# Altium PCB Roboszpon.PcbDoc
Units mm, origin at the board's own origin, x right, y up, seen from the top; angles counter-clockwise.
Board outline 70 x 35 mm, 2 copper layers (Top Layer, Bottom Layer); 60 components, 53 nets, 274 pads, 196 vias.
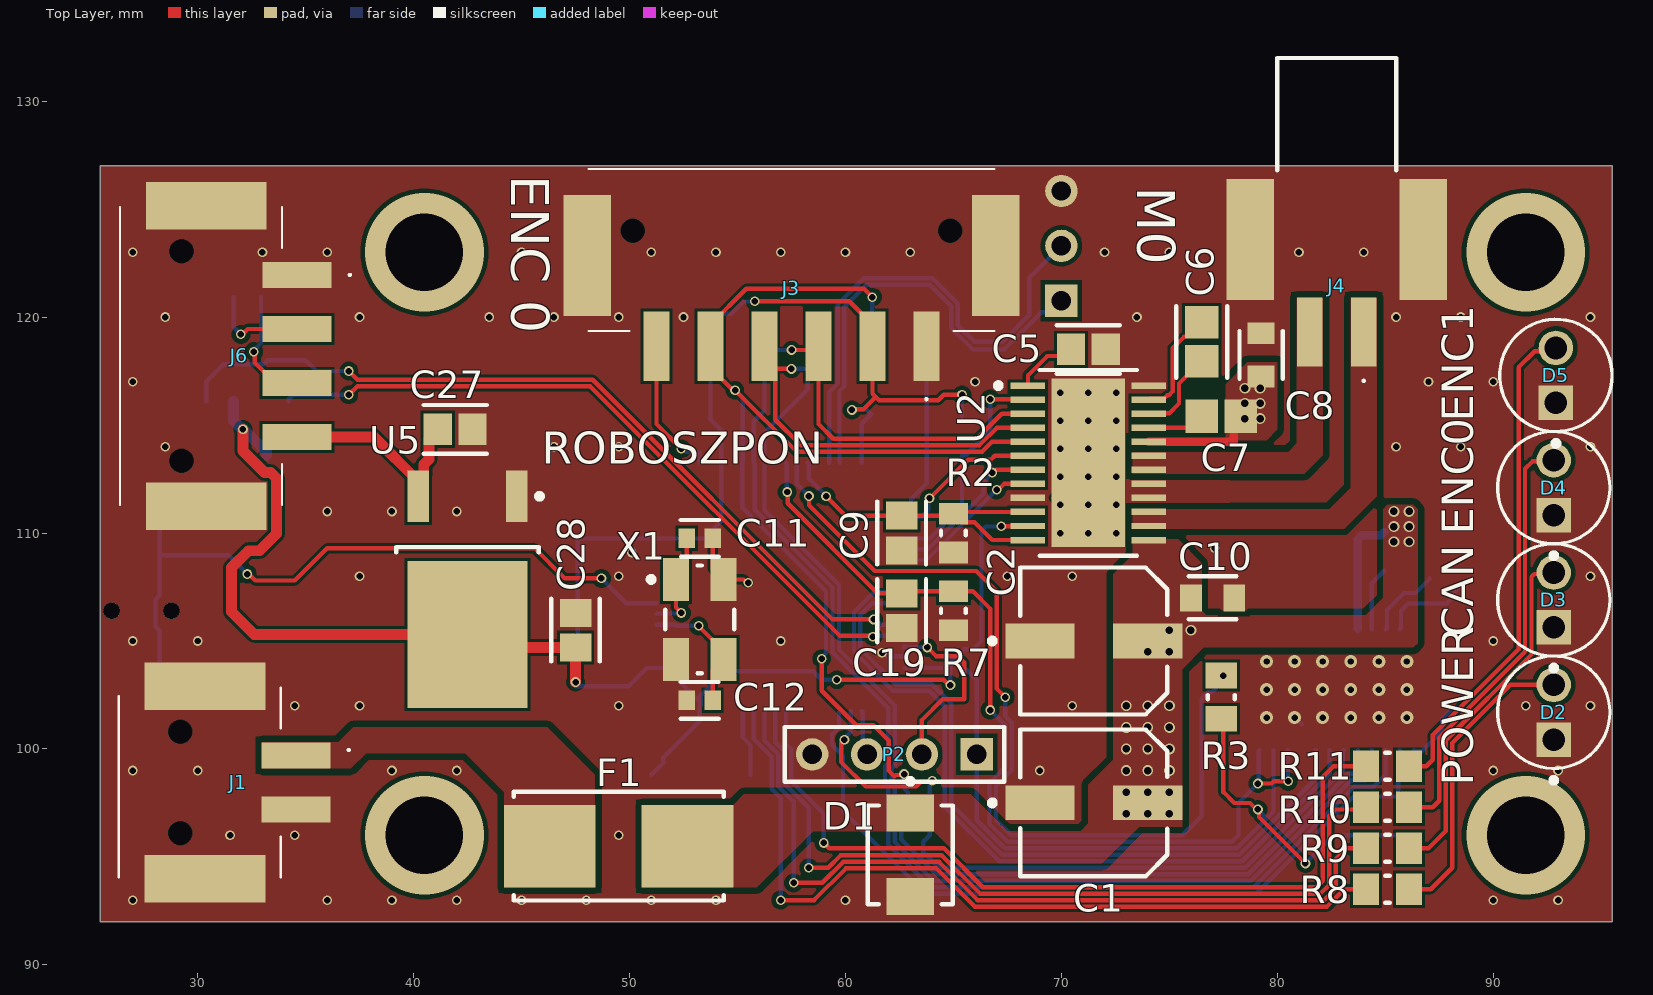
[diagram p0: Top Layer view]
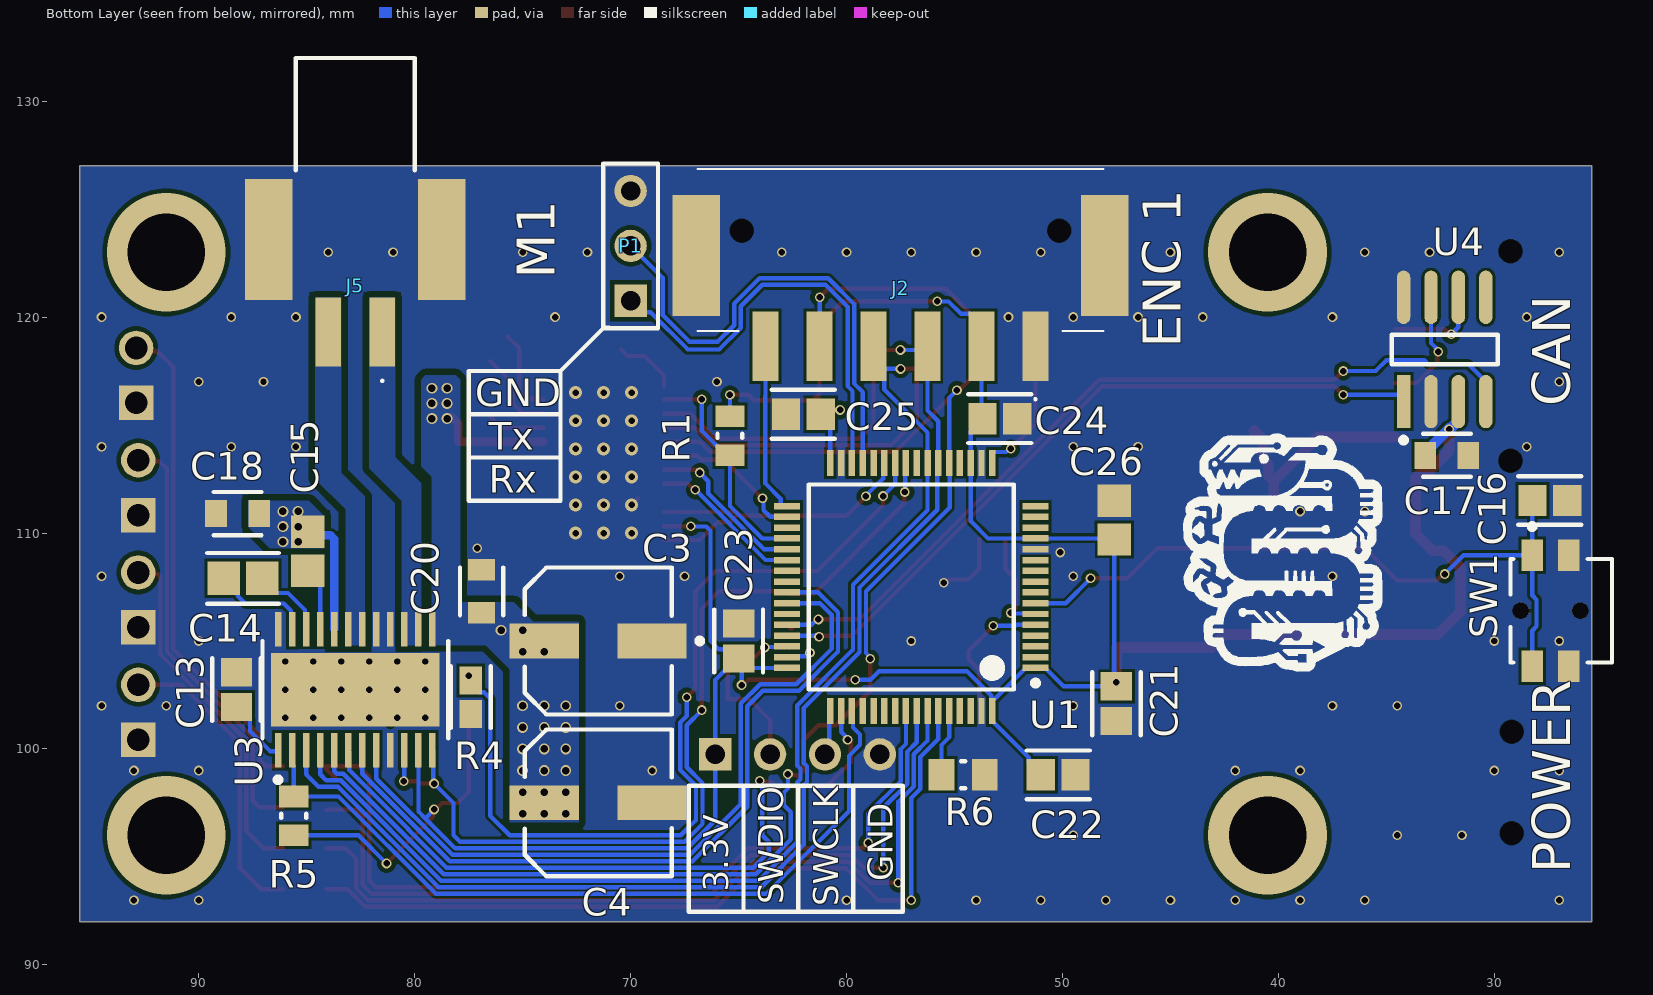
[diagram p1: Bottom Layer view, seen from below]
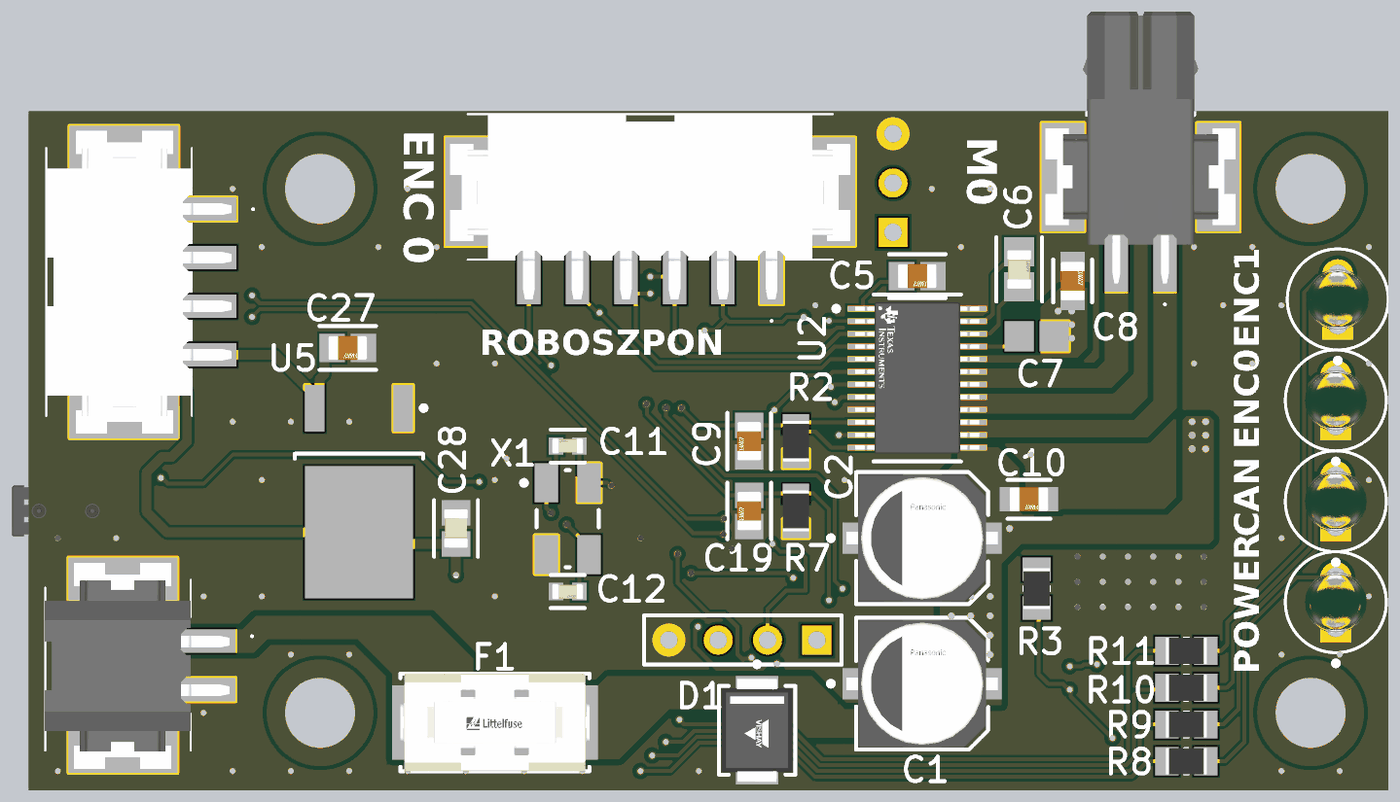
[diagram p2: 3D render of the assembled board from above, using the file's embedded part models]
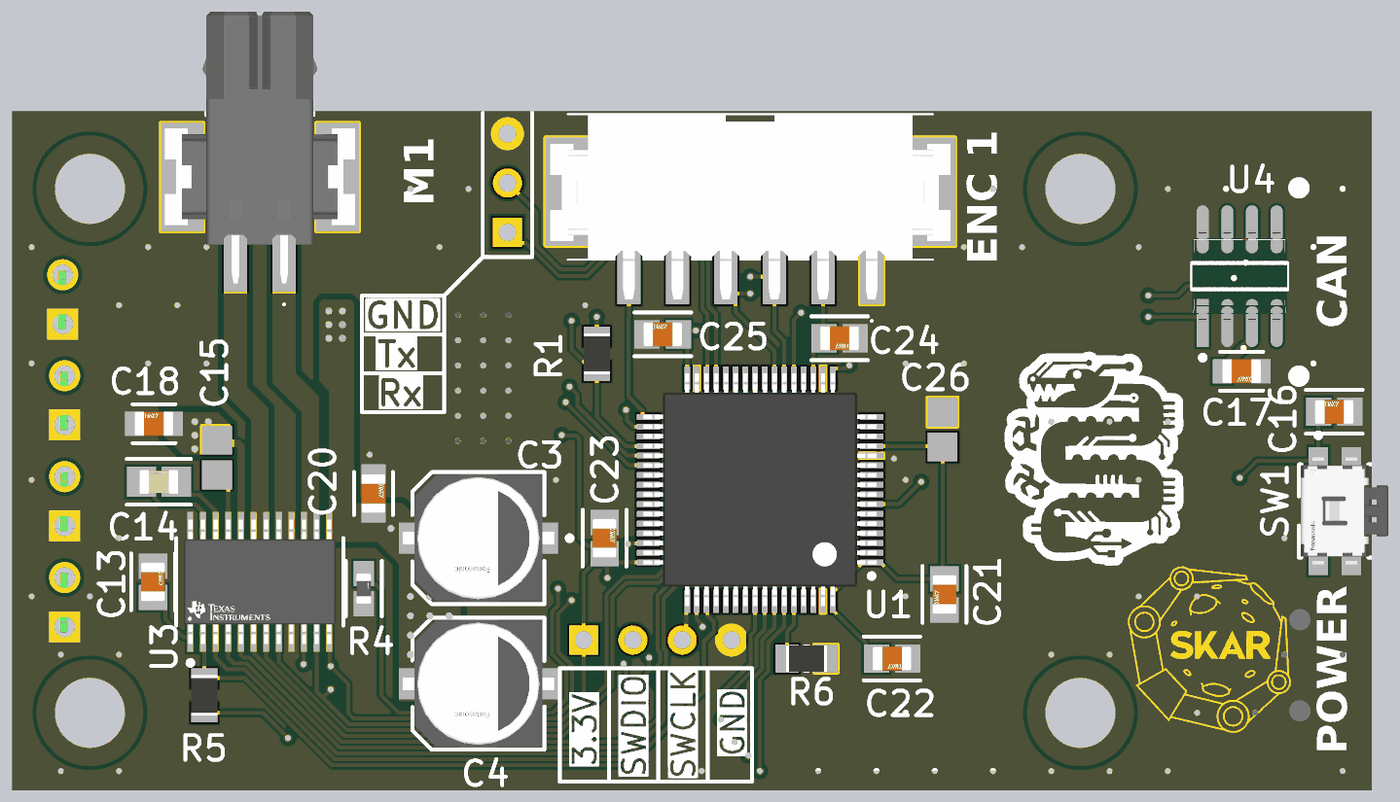
[diagram p3: 3D render of the assembled board from below, using the file's embedded part models]

## Layer stack, top to bottom
Top Solder: solder mask 0.0102, Solder Resist, Dk 3.5
Top Layer: signal copper 0.0356
Dielectric 1: dielectric 0.32, FR-4, Dk 4.8
Bottom Layer: signal copper 0.0356
Bottom Solder: solder mask 0.0102, Solder Resist, Dk 3.5

## Board outline
25.5,92 25.5,127 95.5,127 95.5,92

## Design rules (kind name [scope] priority, off if disabled: settings)
Clearance Clearance_POWER [(InNet('NetJ4_1') OR InNet('NetJ4_2') OR InNet('NETJ5_1') OR InNet('NetJ5_2') OR InNet('NetF1_1') OR InNet('VM'))] p1: gap=0.254 ignorepadtopadclearanceinfootprint=FALSE except(0: SMDPad-Hole THPad-Hole Via-Hole Fill-Hole Poly-Hole Region-Hole Text-Hole; 0.1: Arc-Arc Arc-Track Track-Track; 0.127: Arc-THPad Arc-Fill Arc-Poly Arc-Region Track-THPad Track-Fill Track-Poly Track-Region SMDPad-SMDPad; 0.2: Arc-SMDPad Track-SMDPad; 0.3: Fill-Fill Fill-Poly Fill-Region Poly-Poly Poly-Region Region-Region; 0.5: THPad-THPad THPad-Fill THPad-Poly THPad-Region)
Clearance [All] p2: gap=0.127 ignorepadtopadclearanceinfootprint=FALSE except(0: SMDPad-Hole THPad-Hole Via-Hole Fill-Hole Poly-Hole Region-Hole Text-Hole; 0.1: Arc-Arc Arc-Track Track-Track; 0.2: Arc-SMDPad Track-SMDPad THPad-Fill THPad-Poly THPad-Region Via-Fill Via-Poly Via-Region; 0.254: Arc-Via Arc-Text Arc-Hole Track-Via Track-Text Track-Hole SMDPad-THPad SMDPad-Via SMDPad-Text THPad-Via THPad-Text Via-Via Via-Text Fill-Text Poly-Text Region-Text Text-Text; 0.5: THPad-THPad)
ComponentClearance [All] p1: gap=0.127 collisioncheckmode=3 verticalgap=0.254 showdistances=FALSE
HoleSize [All] p1: absolutevalues=TRUE maxlimit=6.5 minlimit=0.025 maxpercent=80.000 minpercent=20.000
MinimumSolderMaskSliver [All] p1: minsoldermaskwidth=0.08
PlaneClearance [All] p1: clearance=0.2
PlaneConnect [All] p1: planeconnectstyle=Direct reliefexpansion=0.508 reliefentries=4 reliefconductorwidth=0.254 reliefairgap=0.254
PolygonConnect PolygonConnect_GND_POWER [InNet('GND') vs (HasFootprint('FP-FC-G-MFG') OR HasFootprint('FP-CL32-IPC_B') OR HasFootprint('TSON Advance_TOS') OR HasFootprint('XT60+MR60') OR HasFootprint('XT-60') OR HasFootprint('FP-SMAJ-CA-MFG') OR InNamedPolygon('GND_L01_P000'))] p1: connectstyle=Direct reliefconductorwidth=0.254 reliefentries=4 polygonreliefangle="90 Angle" airgapwidth=0.254
PolygonConnect PolygonConnect_GND [InNet('GND')] p2: connectstyle=Direct reliefconductorwidth=0.254 reliefentries=4 polygonreliefangle="90 Angle" airgapwidth=0.254
PolygonConnect [All] p3: connectstyle=Direct reliefconductorwidth=0.254 reliefentries=4 polygonreliefangle="90 Angle" airgapwidth=0.254
RoutingVias [All] p1: holewidth=0.3 width=0.45 viastyle="Through Hole" minholewidth=0.3 minwidth=0.45 maxholewidth=0.55 maxwidth=0.7
SilkToSilkClearance [All] p1: silktosilkclearance=0
SilkToSolderMaskClearance [IsPad] p1: minsilkscreentomaskgap=0.15 clearancetoexposedcopper=TRUE
SolderMaskExpansion [All] p1: expansion=0.1 istentingtop=FALSE
Width Width_voltage [InNetClass('Voltage')] p1: maxlimit=0.5 minlimit=0.18 preferedwidth=0.18 minimp=50.000000 maximp=50.000000 favimp=50.000000
Width [All] p2: maxlimit=0.5 minlimit=0.127 preferedwidth=0.2 minimp=50.000000 maximp=50.000000 favimp=50.000000
23 further rules are at their usual default settings.

## Components (designator, comment, footprint, x,y, rotation, side; value= is the part's Value field where it differs from the comment)
C1 "100uF" FP-FTD-MFG 71.5,97.5 r0 top
C2 "100uF" FP-FTD-MFG 71.5,105 r0 top
C3 "100uF" FP-FTD-MFG 71.5,105 r0 bottom
C4 "100uF" FP-FTD-MFG 71.5,97.5 r0 bottom
C5 "1uF" FP-0805-L_2_01_0_2-W_1_25-IPC_B 71.25,118.5 r0 top
C6 "47nF" FP-C0805C-DN-IPC_A 76.5,118.849 r270 top value="47,000 pF"
C7 "1uF" CAPC2013X145X50ML20T25 77.4,115.4 r0 top
C8 "100nF" FP-0805-L_2_01_0_2-W_1_25-MFG 79.25,118.25 r90 top
C9 "???uF" FP-0805-L_2_01_0_2-W_1_25-IPC_B 62.6,110 r270 top
C10 "100nF" FP-0805-L_2_01_0_2-W_1_25-MFG 77,107 r0 top
C11 "18pF" FP-C0603C-CF-MFG 53.25,109.75 r0 top value="18 pF"
C12 "18pF" FP-C0603C-CF-MFG 53.25,102.25 r180 top value="18 pF"
C13 "1uF" FP-0805-L_2_01_0_2-W_1_25-IPC_B 88.25,102.75 r90 bottom
C14 "47nF" FP-C0805C-DN-IPC_A 87.95,107.9 r180 bottom value="47,000 pF"
C15 "1uF" CAPC2013X145X50ML20T25 84.95,109.15 r90 bottom
C16 "100nF" FP-0805-L_2_01_0_2-W_1_25-IPC_B 27.432,111.506 r0 bottom
C17 "100nF" FP-0805-L_2_01_0_2-W_1_25-MFG 32.2,113.6 r180 bottom
C18 "100nF" FP-0805-L_2_01_0_2-W_1_25-MFG 88.2,110.9 r0 bottom
C19 "???uF" FP-0805-L_2_01_0_2-W_1_25-IPC_B 62.6,106.4 r270 top
C20 "100nF" FP-0805-L_2_01_0_2-W_1_25-MFG 76.9,107.3 r90 bottom
C21 "100nF" FP-0805-L_2_01_0_2-W_1_25-IPC_B 47.5,102.1 r270 bottom
C22 "100nF" FP-0805-L_2_01_0_2-W_1_25-IPC_B 50.2,98.8 r180 bottom
C23 "100nF" FP-0805-L_2_01_0_2-W_1_25-IPC_B 65,105 r90 bottom
C24 "100nF" FP-0805-L_2_01_0_2-W_1_25-IPC_B 52.9,115.3 r180 bottom
C25 "100nF" FP-0805-L_2_01_0_2-W_1_25-IPC_B 62,115.5 r0 bottom
C26 "1uF" CAPC2013X145X50ML20T25 47.6,110.6 r270 bottom
C27 "100nF" FP-0805-L_2_01_0_2-W_1_25-IPC_B 41.925,114.8 r0 top
C28 "10uF" FP-C0805C-DG-IPC_B 47.5,105.5 r90 top
D1 "SMBJ30A" FP-SMBJ30A-E3-52-0 63,95.1 r270 top
D2 "TLLG4401" FP-6_544-5255_01-4-MFG 92.8,101.7 r90 top
D3 "TLLG4401" FP-6_544-5255_01-4-MFG 92.8,106.9 r90 top
D4 "TLLG4401" FP-6_544-5255_01-4-MFG 92.8,112.1 r90 top
D5 "TLLG4401" FP-6_544-5255_01-4-MFG 92.9,117.3 r90 top
F1 "0154004.DR" FP-0154-MFG 49.5,95.5 r0 top
J1 "1708004" 1708004 30.45,98.45 r270 top
J2 "1814951" 1814951 57.5,122.75 r0 bottom
J3 "1814951" 1814951 57.5,122.75 r180 top
J4 "M0" 1815125 82.75,126 r180 top
J5 "M1" 1815125 82.75,126 r0 bottom
J6 "1814935" 1814935 30.5,118.2 r270 top
P1 "Header 3" HDR1X3 70,120.76 r90 bottom
P2 "Header 4" HDR1X4 66.08,99.75 r180 top
R1 "10k" RESC2013X60X35NL10T20 65.4,114.5 r90 bottom
R2 "680" RESC2013X60X35NL10T20 65,110 r90 top
R3 "10k" RESC2013X60X35ML10T20 77.4,102.4 r270 top
R4 "10k NTC" FP-NCP18-0_15-IPC_A 77.4,102.4 r90 bottom
R5 "10k" RESC2013X60X35NL10T20 85.6,96.9 r270 bottom
R6 "10k" RESC2013X60X35ML10T20 54.6,98.8 r0 bottom
R7 "680" RESC2013X60X35NL10T20 65,106.4 r90 top
R8 "1K" RESC2013X60X35ML10T20 85.1,93.5 r0 top
R9 "1K" RESC2013X60X35ML10T20 85.1,95.4 r0 top
R10 "1K" RESC2013X60X35ML10T20 85.1,97.3 r0 top
R11 "1K" RESC2013X60X35ML10T20 85.1,99.2 r0 top
SW1 "EVQ-PUD02K" FP-EVQ-PUD02K-MFG 26.9,106.4 r90 bottom
U1 "STM32F103RBT6TR" STM-LQFP64_V 57,107.5 r0 bottom
U2 "DRV8873SPWPRQ1" FP-PWP0024J-MFG 71.25,113.25 r0 top
U3 "DRV8873SPWPRQ1" FP-PWP0024J-MFG 82.75,102.75 r90 bottom
U4 "SN65HVD230DR" FP-D0008A-IPC_A 32.3,118.5 r90 bottom
U5 "LD1117DT33TR" TO-252_M 42.5,107.4 r270 top
X1 "8MHz" TXC-7B-4_V 53.25,106 r270 top

## Footprints (in the part's own frame and the unit in brackets; to place one, negate y for a bottom-side part, rotate by r counter-clockwise, add the part's x,y. Pads: shape width x height; smd on the part's side, far side on the other; paste and mask are expansions set on the pad)
1708004 [mm]
  rect 1.2x3.2 smd: 1(-1.25,4.1) 2(1.25,4.1)
  round 0.55 hole 1.1 unplated: MH1(2.35,-1.25) MH2(-2.35,-1.25)
  rect 2.2x5.6 smd: MP1(-4.45,-0.1) MP2(4.45,-0.1)
  silkscreen extent -4.4,-4.1 4.4,6.6, body extent -5.27,-4.11 5.33,5.39, height 5
1814935 [mm]
  rect 1.2x3.2 smd: 1(-3.75,4.1) 2(-1.25,4.1) 3(1.25,4.1) 4(3.75,4.1)
  round 0.55 hole 1.1 unplated: MH1(4.85,-1.25) MH2(-4.85,-1.25)
  rect 2.2x5.6 smd: MP1(-6.95,-0.1) MP2(6.95,-0.1)
  silkscreen extent -6.9,-4.1 6.9,6.6, body extent -7.8,-4.06 7.8,5.44, height 5
1814951 [mm]
  rect 1.2x3.2 smd: 1(-6.25,4.1) 2(-3.75,4.1) 3(-1.25,4.1) 4(1.25,4.1) 5(3.75,4.1) 6(6.25,4.1)
  round 0.55 hole 1.1 unplated: MH1(7.35,-1.25) MH2(-7.35,-1.25)
  rect 2.2x5.6 smd: MP1(-9.45,-0.1) MP2(9.45,-0.1)
  silkscreen extent -9.4,-4.1 9.4,6.6, body extent -10.3,-4.06 10.3,5.44, height 5
1815125 [mm]
  rect 1.2x3.2 smd: 1(-1.25,6.7) 2(1.25,6.7)
  rect 2.2x5.6 smd: MP1(-4,2.4) MP2(4,2.4)
  silkscreen extent -2.75,-6 2.75,9, body extent -4.9,-6.13 4.9,7.87, height 5
CAPC2013X145X50ML20T25 [mm] "Chip Capacitor, 2-Leads, Body 2.00x1.25mm, IPC Low Density"
  rect 1.5x1.55 smd: 1(-0.9,0) 2(0.9,0)
  body extent -1.1,-0.72 1.1,0.72, height 1.45
FP-6_544-5255_01-4-MFG [mm]
  rect 1.6x1.6 hole 1.05 paste-2539.97 mask+0: 1(-1.27,0)
  round 1.6 hole 1.05 paste-2539.97 mask+0: 2(1.27,0)
  silkscreen extent -3.27,-2.6 2.6,2.6, body extent -2.32,-2.32 2.32,2.32, height 0.25
FP-0154-MFG [mm]
  rect 4.24x3.81 smd paste+0 mask+0: 1(-3.185,0) 2(3.185,0)
  silkscreen extent -4.86,-2.51 4.86,2.51, body extent -5.41,-2.62 5.41,2.62, height 0.25
FP-0805-L_2_01_0_2-W_1_25-IPC_B [mm]
  rect 1.305x1.456 smd paste+0 mask+0: 1(-0.806,0) 2(0.806,0)
  silkscreen extent -1.46,-1.13 1.46,1.13, body extent -1.71,-0.98 1.71,0.98, height 0.25
FP-0805-L_2_01_0_2-W_1_25-MFG [mm]
  rect 1x1.25 smd paste+0 mask+0: 1(-1,0) 2(1,0)
  silkscreen extent -1.1,-1 1.1,1, body extent -1.6,-0.82 1.6,0.82, height 0.25
FP-C0603C-CF-MFG [mm]
  rect 0.75x0.9 smd paste+0 mask+0: 1(-0.6,0) 2(0.6,0)
  silkscreen extent -0.87,-0.85 0.88,0.85, body extent -1.2,-0.6 1.2,0.6, height 0.25
FP-C0805C-DG-IPC_B [mm]
  rect 1.305x1.456 smd paste+0 mask+0: 1(-0.801,0) 2(0.801,0)
  silkscreen extent -1.45,-1.13 1.45,1.13, body extent -1.7,-0.98 1.7,0.98, height 0.25
FP-C0805C-DN-IPC_A [mm]
  rect 1.505x1.556 smd paste+0 mask+0: 1(-0.901,0) 2(0.901,0)
  silkscreen extent -1.65,-1.18 1.65,1.18, body extent -2.15,-1.28 2.15,1.28, height 0.25
FP-D0008A-IPC_A [mm]
  rect 2.469x0.622 smd paste+0 mask+0: 1(-2.414,1.905)
  rrect100% 2.469x0.622 smd paste+0 mask+0: 2(-2.414,0.635) 3(-2.414,-0.635) 4(-2.414,-1.905) 5(2.414,-1.905) 6(2.414,-0.635) 7(2.414,0.635) 8(2.414,1.905)
  silkscreen extent -4.32,-2.45 0.68,2.45, body extent -3,-2.45 3,2.45, height 1.75
FP-EVQ-PUD02K-MFG [mm]
  rect 1.45x1 smd paste+0 mask+0: 1(2.575,1.35) 2(2.575,-0.35) 3(-2.575,1.35) 4(-2.575,-0.35)
  round 0.75 hole 0.75 unplated paste-2539.97 mask+0: ""(0,-0.875) ""(0,1.875)
  silkscreen extent -2.4,-2.35 4.02,2.35, body extent -2.75,-2.25 2.75,2.25, height 1.95
FP-FTD-MFG [mm]
  rect 3.2x1.6 smd paste+0 mask+0: 1(-2.5,0) 2(2.5,0)
  silkscreen extent -4.82,-3.4 3.4,3.4, body extent -4.35,-3.65 4.35,3.65, height 0.25
FP-NCP18-0_15-IPC_A [mm]
  rect 1.306x1.058 smd paste+0 mask+0: 1(-0.776,0) 2(0.776,0)
  silkscreen extent -1.43,-0.93 1.43,0.93, body extent -0.8,-0.4 0.8,0.4, height 0.95
FP-PWP0024J-MFG [mm]
  rect 1.6x0.3 smd paste-1000 mask+0: 1(-2.8,3.575) 2(-2.8,2.925) 3(-2.8,2.275) 4(-2.8,1.625) 5(-2.8,0.975) 6(-2.8,0.325) 7(-2.8,-0.325) 8(-2.8,-0.975) 9(-2.8,-1.625) 10(-2.8,-2.275) 11(-2.8,-2.925) 12(-2.8,-3.575) 13(2.8,-3.575) 14(2.8,-2.925) 15(2.8,-2.275) 16(2.8,-1.625) 17(2.8,-0.975) 18(2.8,-0.325) 19(2.8,0.325) 20(2.8,0.975) 21(2.8,1.625) 22(2.8,2.275) 23(2.8,2.925) 24(2.8,3.575)
  rect 3.4x7.8 smd paste-1000 mask-1000: 25(0,0)
  silkscreen extent -4.3,-4.3 2.25,4.3, body extent -3.7,-4.2 3.7,4.2, height 0.25
FP-SMBJ30A-E3-52-0 [mm]
  rect 1.716x2.18 smd paste+0 mask+0: 1(-1.937,0) 2(1.937,0)
  silkscreen extent -3.52,-1.97 2.28,1.97, body extent -2.9,-2.07 2.9,2.07, height 0.25
HDR1X3 [mm] "Connector; Header; 3 Position"
  rect 1.5x1.5 hole 0.9: 1(0,0)
  round 1.5 hole 0.9: 2(2.54,0) 3(5.08,0)
  silkscreen extent -1.27,-1.27 6.35,1.27
HDR1X4 [mm] "Connector; Header; 4 Position"
  rect 1.5x1.5 hole 0.9: 1(0,0)
  round 1.5 hole 0.9: 2(2.54,0) 3(5.08,0) 4(7.62,0)
  silkscreen extent -1.27,-1.27 8.89,1.27
RESC2013X60X35ML10T20 [mm] "Chip Resistor, 2-Leads, Body 2.1x1.35mm, IPC Low Density"
  rect 1.2x1.45 smd: 1(-1,0) 2(1,0)
  silkscreen extent -0.1,-0.63 0.1,0.63, body extent -1.05,-0.68 1.05,0.67, height 0.6
RESC2013X60X35NL10T20 [mm] "Chip Resistor, 2-Leads, Body 2.1x1.35mm, IPC Medium Density"
  rect 1x1.35 smd: 1(-0.9,0) 2(0.9,0)
  silkscreen extent -0.1,-0.58 0.1,0.58, body extent -1.05,-0.68 1.05,0.67, height 0.6
STM-LQFP64_V [mm] "Thin QFP, 64-Leads, Body 10x10mm, Pitch 0.5mm, ST Recommended"
  rect 1.2x0.3 smd: 1(-5.75,3.75) 2(-5.75,3.25) 3(-5.75,2.75) 4(-5.75,2.25) 5(-5.75,1.75) 6(-5.75,1.25) 7(-5.75,0.75) 8(-5.75,0.25) 9(-5.75,-0.25) 10(-5.75,-0.75) 11(-5.75,-1.25) 12(-5.75,-1.75) 13(-5.75,-2.25) 14(-5.75,-2.75) 15(-5.75,-3.25) 16(-5.75,-3.75) 33(5.75,-3.75) 34(5.75,-3.25) 35(5.75,-2.75) 36(5.75,-2.25) 37(5.75,-1.75) 38(5.75,-1.25) 39(5.75,-0.75) 40(5.75,-0.25) 41(5.75,0.25) 42(5.75,0.75) 43(5.75,1.25) 44(5.75,1.75) 45(5.75,2.25) 46(5.75,2.75) 47(5.75,3.25) 48(5.75,3.75)
  rect 0.3x1.2 smd: 17(-3.75,-5.75) 18(-3.25,-5.75) 19(-2.75,-5.75) 20(-2.25,-5.75) 21(-1.75,-5.75) 22(-1.25,-5.75) 23(-0.75,-5.75) 24(-0.25,-5.75) 25(0.25,-5.75) 26(0.75,-5.75) 27(1.25,-5.75) 28(1.75,-5.75) 29(2.25,-5.75) 30(2.75,-5.75) 31(3.25,-5.75) 32(3.75,-5.75) 49(3.75,5.75) 50(3.25,5.75) 51(2.75,5.75) 52(2.25,5.75) 53(1.75,5.75) 54(1.25,5.75) 55(0.75,5.75) 56(0.25,5.75) 57(-0.25,5.75) 58(-0.75,5.75) 59(-1.25,5.75) 60(-1.75,5.75) 61(-2.25,5.75) 62(-2.75,5.75) 63(-3.25,5.75) 64(-3.75,5.75)
  silkscreen extent -5.87,-4.75 4.75,4.75, body extent -6,-6 6,6, height 1.6
TO-252_M [mm] "D-PAK, 4-Leads, Body 6.1x6.5mm, Pitch 2.28mm, Lead Span 9.7mm, IPC Low Density"
  rect 2.4x1 smd: 1(-4.3,2.28) 3(-4.3,-2.28)
  rect 6.8x5.55 smd: 4(2.1,0)
  silkscreen extent -4.42,-3.3 -1.7,3.46, body extent -1.95,-3.3 4.25,3.3, height 2.4
TXC-7B-4_V [mm] "SMD, 4-Leads, Body 5x3.2mm, Pitch 3.7mm"
  rect 2x1.2 smd: 1(-1.85,-1.1) 2(1.85,-1.1) 3(1.85,1.1) 4(-1.85,1.1)
  silkscreen extent -2.5,-2.37 2.5,1.6, body extent -2.5,-1.6 2.5,1.6, height 1.05

## Part data
C1 C2 C3 C4: library part CMP-05427-000027-1, "CAP ALUM 100UF 20% 35V SMD", Case/Package=Radial, ESR (Equivalent Series Resistance)=260mR, Leakage Current=35uA, Max Operating Temperature=105°C, Min Operating Temperature=-55°C, Package Quantity=1000, Ripple Current=300mA, Tolerance=20%, Voltage=35V, Capacitance=100uF, Construction=Cylindrical, Contact Plating=Tin, Diameter=6.3mm, Height=5.8mm, Height - Seated (Max)=0.24inch, Lead Diameter=0.65mm, Lead Pitch=1.8mm, Length=5.8mm, Life (Hours)=2000Hour, Mount="Surface Mount", Number of Pins=2, Packaging="Tape and Reel", Polarity=Polar, Radiation Hardening=No, REACH SVHC="No SVHC", Ripple Current (AC)=300mA, RoHS Compliant=Yes, Series=FT, Termination=SMD/SMT, Voltage Rating=35V, Voltage Rating (DC)=35V
C5 C9 C13 C19: library part CMP-2007-04174-2, "General Purpose Ceramic Capacitor, 0805, 100nF, 10%, X7R, 15%, 100V", Capacitance=100nF, Case Code (Imperial)=0805, Case Code (Metric)=2012, Dielectric=X7R, Dielectric Material=Ceramic, Max Operating Temperature=125°C, Min Operating Temperature=-55°C, Package Quantity=2000, Tolerance=10%, Voltage=100V, Case/Package=0805, Construction=Flat, Contact Plating=Tin, Depth=1.25mm, Height=1.4mm, Lead Free="Lead Free", Length=2.01mm, Mount="Surface Mount", Number of Pins=2, Packaging="Tape and Reel", Radiation Hardening=No, REACH SVHC="No SVHC", RoHS Compliant=Yes, Series=-, Termination=SMD/SMT, Thickness=0.055inch, Voltage Rating=100V, Voltage Rating (DC)=100V, Width=0.049inch
C6 C14: library part CMP-2007-01098-2, "CAP CER 0.047UF 50V X7R 0805", Capacitance="47,000 pF", Manufacturer=KEMET, Manufacturer Part Number=C0805C473K5RACTU, Package=C0805C-DN, Temperature="-55°C to +125°C", Temperature Characteristic=X7R, Temperature Coefficient=30ppm/°C, Temperature Range High=+125°C, Temperature Range Low=-55°C, Tolerance=0.1, Voltage Rating="50 V", Automotive=No, Category=Cap, ComponentLink2Description=Datasheet, ComponentLink2URL=https://content.kemet.com/datasheets/KEM_C1003_C0G_SMD.pdf, Device Class L1="Passive Components", Device Class L2=Capacitors, Device Class L3="Ceramic Capacitors", Digikey Description="CAP CER 0.047UF 50V X7R 0805", Height=0.88mm, Ipc Land Pattern Name=CAPC200125X78, Lead Free=Yes, Material=Ceramic, Mouser Description="Capacitor; Ceramic; Cap 0.047 uF; Tol 10%; Vol-Rtg 50 VDC; SMT; 0805; X7R; Tape&Reel", Octopart=https://octopart.com/c0805c473k5ractu-kemet-138387, RoHS=TRUE
C7 C15 C26: library part CMP-1036-04746-2, Manufacturer=Kemet, Part Number=C0805C105K4PACTU
C8 C10 C16 C17 C18 C20 C21 C22 C23 C24 C25 C27: library part CMP-2007-04174-2, "General Purpose Ceramic Capacitor, 0805, 100nF, 10%, X7R, 15%, 100V", Case Code (Imperial)=0805, Case Code (Metric)=2012, Dielectric=X7R, Dielectric Material=Ceramic, Max Operating Temperature=125°C, Min Operating Temperature=-55°C, Package Quantity=2000, Tolerance=10%, Voltage=100V, Capacitance=100nF, Case/Package=0805, Construction=Flat, Contact Plating=Tin, Depth=1.25mm, Height=1.4mm, Lead Free="Lead Free", Length=2.01mm, Mount="Surface Mount", Number of Pins=2, Packaging="Tape and Reel", Radiation Hardening=No, REACH SVHC="No SVHC", RoHS Compliant=Yes, Series=-, Termination=SMD/SMT, Thickness=0.055inch, Voltage Rating=100V, Voltage Rating (DC)=100V, Width=0.049inch
C11 C12: library part CMP-2006-03103-2, "CAP CER 18PF 100V 5% NP0 0603", Capacitance="18 pF", Manufacturer=KEMET, Manufacturer Part Number=C0603C180J1GACTU, Package=C0603C-CF, Temperature="-55°C to +125°C", Temperature Characteristic=C0G, Temperature Coefficient=30ppm/°C, Temperature Range High=+125°C, Temperature Range Low=-55°C, Tolerance=0.05, Voltage Rating="100 V", Automotive=Yes, Automotive Grade="Grade 1", Category=Cap, ComponentLink2Description=Datasheet, ComponentLink2URL=https://api.kemet.com/component-edge/download/datasheet/C0603C100J5GACAUTO.pdf, Device Class L1="Passive Components", Device Class L2=Capacitors, Device Class L3="Ceramic Capacitors", Digikey Description="CAP CER 18PF 100V 5% NP0 0603", Height=0.87mm, Lead Free=Yes, Material=Ceramic, Mouser Description="Multilayer Ceramic Capacitors MLCC - SMD/SMT 100volts 18pF C0G 5%", Octopart=https://octopart.com/c0603c180j1gactu-kemet-9138579, RoHS=TRUE
C28: library part CMP-2007-03243-2, "CAP CER 10UF 10V X5R 0805", 3DS Part Number=220-00001, Manufacturer=Kemet, Manufacturer Part Number=C0805C106K8PACTU, Package=C0805C-DG, Temperature="-55°C to +85°C", Temperature Characteristic=X5R, Temperature Coefficient=15%, Temperature Range High=+85°C, Temperature Range Low=-55°C, Tolerance=10%, Voltage=10V, Automotive=No, Capacitance=10uF, Category=Cap, ComponentLink2Description=Datasheet, ComponentLink2URL=https://content.kemet.com/datasheets/KEM_C1006_X5R_SMD.pdf, Device Class L1="Passive Components", Device Class L2=Capacitors, Device Class L3="Ceramic Capacitors", Digikey Description="CAP CER 10UF 10V X5R 0805", Height=1.4mm, Ipc Land Pattern Name=CAPC200125X125, Lead Free=Yes, Material=Ceramic, Mouser Description="CAP CER 10UF 10V X5R 0805", Octopart=https://octopart.com/c0805c106k8pactu-kemet-98697, RoHS=TRUE, Voltage Rating=10V
D1: library part CMP-02577-000026-1, "TVS DIODE 30VWM 48.4VC DO214AA", Breakdown Voltage=36.8V, Case/Package=DO-214AA, Clamping Voltage=48.4V, Leakage Current=1uA, Max Operating Temperature=150°C, Max Power Dissipation=600W, Max Surge Current=12.4A, Min Breakdown Voltage=33.3V, Min Operating Temperature=-55°C, Operating Supply Voltage=30V, Package Quantity=750, Power Line Protection=No, Resistor Type=Zener, Test Current=1mA, Clamping Voltage-Max=48.4V, Diode Type=ZENER, Direction=Unidirectional, Element Configuration=Single, Height=2.24mm, Lead Free="Lead Free", Length=4.57mm, Max Breakdown Voltage=36.8V, Max Reverse Leakage Current=1uA, Mount="Surface Mount", Number Of Channels=1, Number of Elements=1, Number of Pins=2, Number of Unidirectional Channels=1, Packaging="Tape and Reel", Peak Pulse Current=12.4A, Peak Pulse Power=600W, Polarity=Unidirectional, Power Dissipation=600W, Radiation Hardening=No, Reverse Breakdown Voltage=33.3V, Reverse Standoff Voltage=30V, RoHS Compliant=Yes, Series=TransZorb®, Termination=SMD/SMT, Width=3.94mm
D2 D3 D4 D5: library part CMP-00030-39390728-1, "TLLG4401 LED, Green, 2mcd, 3mmDia., T-1, +/-25deg, 565nm, 7mA, 1.9V Vf, 20V Vr, 20mW, -40", Ambient Temperature Range High=100°C, Case/Package=Radial, Color=Green, Forward Current=2mA, Forward Voltage=1.9V, Min Operating Temperature=-40°C, Power Dissipation=20mW, Reverse Voltage=6V, Voltage Rating (DC)=2.4V, Depth=3.2mm, Dominant Wavelength=575nm, Height=4.5mm, Illumination Color=Green, Lead Free="Lead Free", Lead Length=23mm, Length=3.2mm, Lens Color=Green, Lens Style="Circular, Colored, Diffused, Dome, Round, Tinted", Lens Transparency=Diffused, Luminous Intensity=2mcd, Max Junction Temperature (Tj)=100°C, Max Operating Temperature=100°C, Mount="Through Hole", NexarPartId=39390728, Number of Elements=1, Number of LEDs=1, Number of Pins=2, Packaging=Bulk, Peak Wavelength=565nm, Radiation Hardening=No, REACH SVHC=Unknown, RoHS=Compliant, Schedule B="8541402000, 8541402000", Test Current=2mA, Viewing Angle=25°, Wavelength=575nm
F1: library part CMP-08605-000003-1, "FUSE BRD MNT 4A 125VAC/VDC 2SMD", Fuse Current=4A, Manufacturer=Littelfuse, Max Fuse Ac Voltage=125V, Package=0154, Temperature="-55°C to +125°C", Temperature Range High=+125°C, Temperature Range Low=-55°C, Automotive=No, Category=Fuse, ComponentLink2Description=Datasheet, ComponentLink2URL=https://www.littelfuse.com/~/media/electronics/datasheets/fuses/littelfuse_fuse_154_154t_154l_154tl_datasheet.pdf.pdf, Device Class L1="Circuit Protection", Device Class L2=Fuses, Device Class L3=unset, Digikey Description="FUSE BRD MNT 4A 125VAC/VDC 2SMD", Fuse Blow Speed=Fast, Height=3.81mm, Lead Free=Yes, Manufacturer Part Number=0154004.DR, Max Fuse Dc Voltage=125V, Mouser Description="Surface Mount Fuses Fuseblock w/ fuse 4A OMNI BLOK 154", Octopart=https://octopart.com/0154004.dr-littelfuse-565861, RoHS=TRUE
J1: "Pluggable Terminal Blocks PTSM 0,5/ 2-HH- 2,5-SMD WH R32", Manufacturer_Name="Phoenix Contact", Mouser Part Number=651-1708004, Datasheet Link=http://www.phoenixcontact.net/product/1708004, Geometry.Height=5.1mm, Manufacturer_Part_Number=1708004, Mouser Price/Stock=https://www.mouser.co.uk/ProductDetail/Phoenix-Contact/1708004?qs=lk7NfA15ZfaUlLrlGV0nCA%3D%3D
J2 J3: "Pluggable Terminal Blocks PTSM 0,5/ 6-HH0-2,5- SMD WH R44"
J4 J5: library part 1815125, "Phoenix Contact PTSM Series, 2.5mm Pitch Printed Circuit Board Connector, 6A", Manufacturer_Name="Phoenix Contact", Mouser Part Number=651-1815125, Datasheet Link=https://www.phoenixcontact.com/online/portal/ca/?uri=pxc-oc-itemdetail:pid=1815125&library=caen&pcck=P-11-02-11&tab=1&selectedCategory=ALL, Geometry.Height=5mm, Manufacturer_Part_Number=1815125, Mouser Price/Stock=https://www.mouser.com/Search/Refine.aspx?Keyword=651-1815125
J6: "Pluggable Terminal Blocks PTSM 0,5/ 4-HH0-2,5- SMD WH R32"
P1: "Header, 3-Pin", LatestRevisionDate=17-Jul-2002, LatestRevisionNote="Re-released for DXP Platform.", Publisher="Altium Limited"
P2: "Header, 4-Pin", LatestRevisionDate=17-Jul-2002, LatestRevisionNote="Re-released for DXP Platform.", Publisher="Altium Limited"
R1 R2 R5 R7: library part CMP-1659-00013-4, "Chip Resistor, 10 KOhm, +/- 1%, 0.125 W, -55 to 155 degC, 0805 (2012 Metric), RoHS, Tape and Reel", Manufacturer=Yageo, Max Operating Temperature="155 degC", Min Operating Temperature="-55 degC", Package Quantity=5000, Voltage Rating="150 V", ComponentLink1Description="Manufacturer URL", ComponentLink1URL=http://www.yageo.com/, ComponentLink2Description=Datasheet, ComponentLink2URL=http://www.yageo.com/documents/recent/PYu-RC_Group_51_RoHS_L_04.pdf, DatasheetVersion="Rev. 4, 02/2016", Height="0.5 mm", Length="2 mm", Mount="Surface Mount", Mounting Technology="Surface Mount", PackageDescription="2-Pin Surface Mounted Device, Body 2 x 1.25 mm", PackageReference=0805, Packaging="Tape and Reel", Pins=2, REACH SVHC="No SVHC", RoHSCompliant=true
R3 R6: library part CMP-2100-03673-1, "Chip Resistor, 0 Ohm, Jumper, +/- 5%, 0.125 W, -55 to 155 degC, 0805 (2012 Metric), RoHS, Tape and Reel", Case Code (Imperial)=0805, Case Code (Metric)=2012, Manufacturer=Yageo, Max Operating Temperature=155degC, Min Operating Temperature=-55degC, Package Description="2-Pin Surface Mounted Device, Body 2 x 1.25 mm", Power Rating=125mW, Resistance=0mOhm, Temperature Coefficient=200ppm/degreesC, Tolerance=5%, Voltage Rating=150V, Case/Package=0805, Composition=ThickFilm, Contact Plating=Tin, Datasheet URL=http://www.yageo.com/NewPortal/yageodocoutput?fileName=/pdf/R-Chip/PYu-RC_Group_51_RoHS_L_5.pdf, Datasheet Version="Rev. 5, 10/2016", Depth=1.25mm, Height=0.5mm, Lead Free=LeadFree, Length=2mm, Manufacturer URL=http://www.yageo.com/, Military Standard=Not, Number of Pins=2, Package Reference=0805, Packaging=TapeandReel, Radiation Hardening=No, REACH SVHC=Unknown, RoHSCompliant=true, Termination=SMD/SMT, Voltage Rating (DC)=150V, Width=1.25mm
R4: library part CMP-2000-05271-3, "NTC Thermistor for Temperature Sensor, 0603, 10kΩ, 1%, 0.1mA, 5V", Case Code (Imperial)=0603, Case Code (Metric)=1608, Current Rating=310uA, Manufacturer Series=NCP18, Max Operating Temperature=125°C, Max Power Dissipation=100mW, Min Operating Temperature=-40°C, Package Quantity=1, Package Shape=Rectangular, Resistance=10kR, Resistance Tolerance=1%, Accuracy=0.7%, Case/Package=0603, Depth=0.8mm, Height=0.8mm, Lead Free="Lead Free", Length=1.6mm, Mount="Surface Mount", Number of Pins=2, Number of Terminals/Pins=2, Packaging="Tape and Reel", Power Rating=100mW, Radiation Hardening=No, REACH SVHC="No SVHC", RoHS Compliant=Yes, Series=NCP, Terminal Finish=Tin, Terminal Placement=Dual, Termination=SMD/SMT, Thermistor Application="TEMPERATURE COMPENSATION", Tolerance=1%
R8 R9 R10 R11: library part CMP-2100-03671-1, "Chip Resistor, 1 KOhm, +/- 1%, 125 mW, -55 to 155 degC, 0805 (2012 Metric), RoHS, Tape and Reel", Case Code (Imperial)=0805, Case Code (Metric)=2012, Manufacturer=Yageo, Max Operating Temperature=155degC, Max Power Dissipation=125mW, Min Operating Temperature=-55degC, Package Description="2-Pin Surface Mounted Device, Body 2 x 1.25 mm", Package Quantity=1, Resistance=1KOhm, Temperature Coefficient=100ppm/degreesC, Tolerance=1%, Voltage Rating=150V, Case/Package=0805, Composition=ThickFilm, Datasheet URL=http://www.yageo.com/NewPortal/yageodocoutput?fileName=/pdf/R-Chip/PYu-RC_Group_51_RoHS_L_5.pdf, Datasheet Version="Rev. 5, 10/2016", Depth=1.25mm, Height=0.024inch, Lead Free=LeadFree, Length=0.079inch, Manufacturer URL=http://www.yageo.com/, Military Standard=Not, Number of Pins=2, Number of Terminations=2, Package Reference=0805, Packaging=TapeandReel, Power Rating=125mW, REACH SVHC=Unknown, RoHSCompliant=true, Termination=SMD/SMT, Voltage Rating (DC)=150V, Width=0.049inch
SW1: library part CMP-05618-000144-1, "SWITCH TACTILE SPST-NO 0.05A 12V", Actuator Color=Black, Contact Current Rating=50mA, Contact Resistance=500mR, Max Operating Temperature=70°C, Max Voltage Rating (DC)=12V, Min Operating Temperature=-20°C, Operating Force=2.2N, Package Quantity=1, Actuator Length=1mm, Contact Plating=Gold, Current Rating=50mA, Depth=4.5mm, Electrical Life=100000Cycles, Height=1.65mm, Illumination Type=Non-Illuminated, Lead Free="Lead Free", Length=4.7mm, Max Current Rating=50mA, Mechanical Life=100000Cycles, Mount="Surface Mount", Orientation="Right Angle", Packaging="Tape and Reel", Radiation Hardening=No, REACH SVHC="No SVHC", RoHS Compliant=Yes, Series=EVQPU, Size=3.5mm, Switch Function=Off-Mom, Switch Travel=0.3mm, Termination=J-Bend, Throw Configuration=SPST, Voltage Rating (DC)=12V, Width=3.5mm
U1: library part CMP-0237-00169-4, "ARM Cortex-M3 32-bit MCU, 128 KB Flash, 20 KB Internal RAM, 51 I/Os, 64-pin LQFP, -40 to 85 degC, Tape and Reel", I/Os (High Current)=51, Operating Frequency(F) (Processor speed) (MHz)=72, Supply Voltage(Vcc) min (V)=2, A/D Converter="2x12-bit (16 Channel)", ComponentLink1Description="Manufacturer URL", ComponentLink1URL=http://www.st.com/web/en/home.html, ComponentLink2Description=Datasheet, ComponentLink2URL=http://www.st.com/st-web-ui/static/active/en/resource/technical/document/datasheet/CD00161566.pdf, ComponentLink3Description="Package Specification", ComponentLink3URL=http://www.st.com/st-web-ui/static/active/en/resource/technical/document/datasheet/DM00037051.pdf, Core="ARM Cortex-M3", DatasheetVersion="Rev. 16", FLASH Size (Prog) (kB)=128, Internal RAM Size (kB)=20, Mounting Technology="Surface Mount", PackageDescription="64-Pin Low Profile Quad Flat Package, 10 x 10 mm Body, 0.5 mm Pitch", PackageReference=LQFP64, PackageVersion="Rev. 4, 06/2013", Packing="Tape and Reel", PartNumber=STM32F103RBT6TR
U2 U3: library part CMP-04915-000063-1, "IC MTRDRV UNIPLR 0-5.5V 24HTSSOP", Max Operating Temperature=125°C, Min Operating Temperature=-40°C, Output Current=10mA, Interface=SPI, Logic Function="AND GATE", Mount="Surface Mount", Packaging="Cut Tape", RoHS Compliant=Yes
U4: library part CMP-0315-00015-3, "IC TRANSCEIVER HALF 1/1 8SOIC", Case/Package=D, Max Operating Temperature=85°C, Max Supply Current=17mA, Max Supply Voltage=3.6V, Min Operating Temperature=-40°C, Min Supply Voltage=3V, Operating Supply Voltage=3.3V, Package Quantity=1, Contact Plating=Gold, Data Rate=1Mbps, Lead Free="Lead Free", Nominal Supply Current=17mA, Number of Drivers=1, Number of I/Os=2, Number of Pins=8, Number of Receive Buffers=1, Number of Receivers=1, Number of Transceivers=1, Number of Transmit Buffers=1, Packaging="Tape and Reel", Radiation Hardening=No, REACH SVHC="No SVHC", Termination=SMD/SMT, Weight=0.002561oz
U5: library part CMP-0244-00088-1, "Fixed Low Drop Positive Voltage Regulator, 3.3V, 3-Pin DPAK, Tape and Reel", ComponentLink1Description="Manufacturer URL", ComponentLink1URL=http://www.st.com, ComponentLink2Description=Datasheet, ComponentLink2URL=http://www.st.com/internet/com/TECHNICAL_RESOURCES/TECHNICAL_LITERATURE/DATASHEET/CD00000544.pdf, DatasheetVersion=1/11/2011, PackageDescription="3-Pin Transistor Outline Package 2.28 mm Pitch, 9.7 mm Lead Span (DPAK)", PackageReference=TO-252, PackageVersion=2011
X1: library part CMP-1774-00004-1, "SMD Seam Sealing Crystal, 8 MHz, +/- 30 ppm, 18 pF, -10 to 70 degC, 4-Pin SMD, RoHS, Tape and Reel", Case Code (Imperial)=0603, Case Code (Metric)=1608, Max Operating Temperature="155 degC", Min Operating Temperature="-55 degC", Package Quantity=5000, Power Rating="100 mW", Resistance="150 Ohm", Tolerance=1%, Voltage Rating="50 V", Case\Package=0603, ComponentLink1Description=Datasheet, ComponentLink1URL=http://www.txccorp.com/download/products/quartz_crystals/2015TXC_7B_19.pdf, DatasheetVersion=Jul-15, Height="0.45 mm", Length="1.6 mm", Mount="Surface Mount", PackageDescription="4-Pin Surface Mount Device, Body 5 x 3.2 mm, Pitch 3.7 mm", PackageReference=7B-4, Packaging="Tape and Reel", Pins=2, REACH SVHC="No SVHC", RoHSCompliant=true, Voltage Rating (DC)="50 V", Width="0.8 mm"

## Via types
v1: diameter 0.45, hole 0.3, Top Layer to Bottom Layer, tented both sides, 122 vias
v2: diameter 0.6, hole 0.3, Top Layer to Bottom Layer, 36 vias
v3: diameter 0.5, hole 0.35, Top Layer to Bottom Layer, tented both sides, 34 vias
v4: diameter 5.5, hole 3.6, Top Layer to Bottom Layer, 4 vias

## Nets (pads, with @x,y where several pads share a name; then routed paths per layer and width w, separated by ;. In a path a pad name is that pad's centre, name@x,y a point inside that pad or via, vN(x,y) a via of type N, cw(c..) or ccw(c..) an arc to the next point about the centre after c; other vN are vias at no path point)
+3.3: C17.1 C21.1 C22.1 C23.1 C24.1 C25.1 C26.2 C28.1 J2.2 J3.2 P2.1 R1.2 R3.2 R5.2 U1.1 U1.13 U1.19 U1.32 U1.48 U1.64 U2.11 U3.11 U4.3 U5.4 | length 152.7
  Top Layer w0.2: v1(55.8,120.729) 60.171,120.729 61.25,119.65 J3.2 61.25,116.45 61.4,116.3 ; v1(59.6,103.2) 64.551,103.2 64.792,102.959 v1(64.859,102.959) ; v1(60.3,115.7) 60.325,115.725 60.825,115.725 61.4,116.3 ; v1(65.4,116.4) 64.55,116.4 64.3,116.15 61.55,116.15 61.4,116.3 ; v1(67.209,110.309) 67.212,110.312 68.438,110.312 U2.11 ; R3.2 77.5,101.3 77.5,98 78,97.5 78.732,97.5 79.032,97.2 v1(79.1,97.2) 79.148,97.152 79.148,96.852 v1(81.3,94.7)
  Top Layer w0.5: v1(32.1,114.8) 32.1,113.8 33.1,112.8 33.386,112.8 33.65,112.536 33.65,109.964 32.869,109.183 32.352,109.183 31.571,108.402 31.571,106.354 32.625,105.3 U5.4 43.101,104.699 C28.1 v1(47.5,103.1)
  Bottom Layer w0.2: C21.1 49.956,102.906 50.8,103.75 U1.1 51.7,103.75 U1.64@53.25,102.2 ; v1(47.5,103.1) 47.6,103.2 C26.2 47.65,109.75 U1.13 53.45,109.75 54.25,110.55 U1.19 54.25,114.756 C24.1 53.75,115.344 J2.2 53.75,119.65 54.25,120.15 54.702,120.15 55.275,120.723 55.794,120.723 v1(55.8,120.729) ; C22.1 51.558,99.352 51.558,99.608 53.25,101.3 U1.64 53.25,101.975 53.3,102.025 53.3,102.474 54.426,103.6 58.5,103.6 58.9,103.2 v1(59.6,103.2) ; v1(60.3,115.7) 60.994,115.7 C25.1 60.75,115.056 U1.32 ; U1.48 64.556,103.75 C23.1@64.859,104.054 ; v1(64.859,102.959) C23.1@64.859,104.054 ; R1.2 v1(65.4,116.4) ; v1(67.209,110.309) 67.2,110.3 66.5,110.3 66.3,110.1 66.3,105 65.911,104.611 65.492,104.611 C23.1@65.076,104.194 ; v1(79.1,97.2) 79.514,96.786 ; U3.11 79.825,97.098 79.514,96.786 ; v1(81.3,94.7) 82.6,96 R5.2 ; C23.1@64.859,104.054 C23.1 C23.1@65.076,104.194 ; C23.1@65.076,104.194 66.08,103.19 P2.1 66.08,96.696 67.376,95.4 78.127,95.4 79.514,96.786
  Bottom Layer w0.5: U4.3 31.665,115.196 32.061,114.8 v1(32.1,114.8) ; v1@32.052,114.873 33.2,113.725 C17.1
+5: C27.1 J6.4 U5.3 | length 9.9
  Top Layer w0.5: J6.4 38.17,114.45 U5.3@40.22,112.4 ; U5.3 U5.3@40.22,112.4 ; C27.1@41.14,114.721 41.119,114.741 40.717,114.339 40.717,113.417 40.47,113.17 40.47,112.65 U5.3@40.22,112.4
CAN: R9.1 U1.58 | length 37.9
  Top Layer w0.2: v1(57.6,93.8) 58.924,93.8 59.895,94.77 64.339,94.77 66.109,93 82.176,93 82.7,93.524 82.7,94.9 83.2,95.4 R9.1
  Bottom Layer w0.2: U1.58 56.25,100.386 56.883,99.753 56.883,98.268 57.6,97.551 v1(57.6,93.8)
CAN_RX: U1.44 U4.4 | length 38.8
  Top Layer w0.2: v1(37,117.5) 37.4,117.1 48.3,117.1 59.4,106 v1(61.3,106)
  Bottom Layer w0.2: U4.4 30.395,117.01 31.206,117.821 33.071,117.821 33.25,118 35,118 35.5,117.5 v1(37,117.5) ; v1(61.3,106) 61.368,106 61.618,105.75 U1.44
CAN_TX: U1.45 U4.1 | length 33.7
  Top Layer w0.2: v1(37,116.4) 37.4,116.8 48.176,116.8 59.728,105.248 61.223,105.248 v1(61.271,105.2)
  Bottom Layer w0.2: U4.1 34.205,116.189 34.416,116.4 v1(37,116.4) ; v1(61.271,105.2) 61.339,105.2 61.389,105.25 U1.45
CS_DRV0: U1.34 U2.6 | length 7.2
  Top Layer w0.2: v1(63.892,111.604) 65.688,113.4 66.737,113.4 66.912,113.575 U2.6
  Bottom Layer w0.2: U1.34 63.537,110.75 63.844,111.057 63.844,111.556 v1(63.892,111.604)
CS_DRV1: U1.50 U3.6 | length 33.4
  Top Layer w0.2: v1(59.952,100.431) 59.821,100.3 59.8,100.3 59.8,99.4 60.939,98.261 63.279,98.261 63.496,98.477 63.974,98.477 v1(64.021,98.524)
  Bottom Layer w0.2: v1(59.952,100.431) 59.952,100.498 60.25,100.796 U1.50 ; v1(64.021,98.524) 63.973,98.476 63.973,98.373 63.9,98.3 63.9,96 63.6,95.7 63.6,95.224 64.324,94.5 78.529,94.5 80.3,96.271 80.3,96.3 83.025,99.025 83.025,99.9 U3.6
CS_ENC0: J2.6 U1.33 | length 8
  Bottom Layer w0.2: U1.33 63.002,111.25 63.052,111.3 63.052,111.583 63.758,112.289 63.758,116.352 63.75,116.36 J2.6
CS_ENC1: J3.6 U1.17 | length 6.6
  Top Layer w0.2: J3.6 51.25,115.05 v1(52.4,113.9)
  Bottom Layer w0.2: v1(52.4,113.9) 52.468,113.9 52.618,113.75 53.2,113.75 53.25,113.7 U1.17
ENC1: R10.1 U1.57 | length 38.2
  Top Layer w0.2: v1(58.3,94.5) 59.2,94.5 59.77,95.07 64.463,95.07 66.233,93.3 82,93.3 82.4,93.7 82.4,96.9 82.7,97.2 84.075,97.2 R10.1@84.1,97.175
  Bottom Layer w0.2: U1.57 56.75,100.31 57.183,99.877 57.183,98.393 58.3,97.276 v1(58.3,94.5)
ENC2: R11.1 U1.56 | length 38.7
  Top Layer w0.2: v1(59,95.649) 59.249,95.4 64.558,95.4 66.358,93.6 81.8,93.6 82.1,93.9 82.1,98.7 82.6,99.2 R11.1 84.1,99.075 R11.1@83.6,98.575
  Bottom Layer w0.2: U1.56 57.25,100.235 57.483,100.002 57.483,98.517 59,97 v1(59,95.649)
GND: C1.1 C2.1 C3.1 C4.1 C5.2 C8.2 C9.2 C10.2 C11.2 C12.2 C13.2 C16.1 C17.2 C18.2 C19.2 C20.2 C21.2 C22.2 C23.2 C24.2 C25.2 C26.1 C27.2 C28.2 D1.2 D2.1 D3.1 D4.1 D5.1 J1.2 J1.MP1 J1.MP2 J2.1 J2.MP1 J2.MP2 J3.1 J3.MP1 J3.MP2 J4.MP1 J4.MP2 J5.MP1 J5.MP2 J6.1 J6.MP1 J6.MP2 P1.3 P2.4 R2.1 R4.1 R6.1 R7.1 SW1.2 SW1.4 U1.12 U1.18 U1.31 U1.47 U1.63 U2.9 U2.16 U2.17 U2.24 U2.25 U3.9 U3.16 U3.17 U3.24 U3.25 U4.2 U4.8 U5.1 X1.2 X1.4 | length 5.7
  Top Layer w0.2: C11.2 53.85,108.35 X1.4 55.282,107.85 55.432,107.7 v1(55.5,107.7) ; C19.2@62.524,105.594 C19.2 ; U2.25@69.65,111.625 69.95,111.325 v2(69.95,111.3)
  Bottom Layer w0.2: v1(61.695,104.449) 61.763,104.449 61.912,104.3 62.7,104.3 U1.47 ; U3.25@79.326,101.624 v2(79.5,101.45) ; v2(80.8,101.45) 80.825,101.45 U3.25@81.125,101.15
  other v1: 27,93 36,93 39,93 42,93 45,93 48,93 51,93 54,93 60,93 90,93 93,93 31.5,96 34.5,96 49.5,96 27,99 30,99 39,99 42,99 69,99 90,99 93,99 34.5,102 37.5,102 49.5,102 70.5,102 91.5,102 94.5,102 27,105 30,105 57,105 90,105 37.5,108 49.5,108 67.5,108 70.5,108 94.5,108 50.1,109.1 77.1,109.3 36,111 39,111 42,111 28.5,114 46.5,114 49.5,114 85.5,114 88.5,114 94.5,114 27,117 66,117 87,117 90,117 28.5,120 37.5,120 43.5,120 46.5,120 49.5,120 52.5,120 73.5,120 85.5,120 88.5,120 94.5,120 27,123 33,123 36,123 45,123 51,123 54,123 57,123 60,123 63,123 72,123 75,123 81,123 84,123
  other v2: 82.1,101.45 83.4,101.45 84.7,101.45 86,101.45 79.5,102.75 80.8,102.75 82.1,102.75 83.4,102.75 84.7,102.75 86,102.75 79.5,104.05 80.8,104.05 82.1,104.05 83.4,104.05 84.7,104.05 86,104.05 69.95,110 71.25,110 72.55,110 71.25,111.3 72.55,111.3 69.95,112.6 71.25,112.6 72.55,112.6 69.95,113.9 71.25,113.9 72.55,113.9 69.95,115.2 71.25,115.2 72.55,115.2 69.95,116.5 71.25,116.5 72.55,116.5
I0: C9.1 R2.2 U1.27 U2.10 U2.12 | length 15.7
  Top Layer w0.2: v1(59.1,111.7) 59.994,110.806 C9.1 64.906,110.806 R2.2 ; U2.12 66.8,109.675 65.975,110.5 65.4,110.5 R2.2 ; U2.10 65.075,110.975 R2.2
  Bottom Layer w0.2: U1.27 58.3,113.2 58.3,112.526 58.537,112.288 58.549,112.288 59.1,111.738 v1(59.1,111.7)
I1: C19.1 R7.2 U1.25 U3.10 U3.12 | length 43.2
  Top Layer w0.2: v1@57.3,111.876 v1(57.3,111.9) 57.325,111.875 57.325,111.375 61.494,107.206 C19.1 62.694,107.3 R7.2 65.9,107.3 66.7,106.5 v1(66.7,101.8) ; v1(79.1,98.4) 79.726,98.4 79.826,98.5 v1(80.5,98.5)
  Bottom Layer w0.2: U1.25 57.275,113.225 57.275,111.925 v1(57.3,111.9) ; v1(66.7,101.8) 67.4,101.1 67.4,99.149 66.671,98.419 66.671,96.529 67.5,95.7 77.9,95.7 78.2,96 78.2,97.5 v1(79.1,98.4) 79.137,98.437 79.137,99.913 U3.12 ; U3.10 80.487,99.938 80.487,98.513 v1(80.5,98.5)
MISO: J2.3 J3.3 U1.22 U2.3 U3.3 | length 69.8
  Top Layer w0.2: v1(57.504,118.476) 58.576,118.476 J3.3 58.75,115.05 59.431,114.369 66.082,114.369 67.237,115.525 U2.3
  Bottom Layer w0.2: v1(57.504,118.476) 56.424,118.476 J2.3 56.25,115.675 55.75,115.175 U1.22 55.8,113.2 55.8,111.076 59.4,107.476 59.4,104.476 61.977,101.899 61.977,99.345 61.834,99.202 61.834,98.475 61.977,98.332 61.977,95.574 63.951,93.6 78.901,93.6 83.551,98.25 83.598,98.25 84.451,98.25 85.025,98.824 U3.3
MOSI: J2.4 J3.4 U1.23 U2.4 U3.4 | length 69.9
  Top Layer w0.2: J3.4 56.25,118.1 J3.4@56.75,117.6 ; v1(57.5,117.6) J3.4@56.75,117.6 ; U2.4 67.012,114.875 66.206,114.069 57.931,114.069 56.75,115.25 J3.4@56.75,117.6
  Bottom Layer w0.2: v1(57.5,117.6) J2.4@58.25,117.6 ; J2.4@58.5,118.4 58.5,117.85 J2.4@58.25,117.6 ; U3.4 84.375,98.825 84.1,98.55 83.427,98.55 78.777,93.9 64.076,93.9 62.277,95.699 62.277,98.456 62.134,98.6 62.134,99.078 62.277,99.221 62.277,102.023 59.7,104.6 59.7,107.6 56.25,111.05 U1.23 56.25,114.65 58.25,116.65 J2.4@58.25,117.6
NetC5_1: C5.1 U2.1 | length 3
  Top Layer w0.2: U2.1 68.45,117.3 69.35,118.2 70.144,118.2 C5.1
NetC6_1: C6.1 U2.23 | length 4
  Top Layer w0.2: U2.23 74.1,116.225 74.75,116.225 74.9,116.375 74.974,116.375 75.15,116.551 75.15,117.023 75.15,118.553 75.695,119.098
NetC6_2: C6.2 U2.22 | length 4
  Top Layer w0.2: U2.22 74.075,115.55 74.999,115.55 75.45,116.001 75.45,116.924 76.474,117.948 C6.2
NetC7_1: C7.1 U2.21 | length 2.7
  Top Layer w0.2: U2.21 75.537,114.875 75.975,114.875 C7.1
NetC11_1: C11.1 U1.6 X1.1 | length 4.9
  Top Layer w0.2: v1(52.4,106.3) 52.15,106.55 X1.1 52.65,108.35 C11.1
  Bottom Layer w0.2: U1.6 51.275,106.275 52.375,106.275 v1(52.4,106.3)
NetC12_1: C12.1 U1.5 X1.3 | length 6.1
  Top Layer w0.2: v1(53.2,105.7) 54.35,104.55 X1.3 53.85,103.65 C12.1
  Bottom Layer w0.2: U1.5 52.131,105.75 52.181,105.7 v1(53.2,105.7)
NetC13_1: C13.1 U3.1 | length 3.1
  Bottom Layer w0.2: U3.1 86.375,99.9 86.7,99.9 87.622,100.822 87.622,101.392 88.174,101.944 C13.1
NetC14_1: C14.1 U3.23 | length 4.7
  Bottom Layer w0.2: U3.23 85.725,105.6 85.725,106.399 86.062,106.736 87.84,106.736 88.198,107.095 88.198,107.248 C14.1
NetC14_2: C14.2 U3.22 | length 3.5
  Bottom Layer w0.2: U3.22 85.075,105.6 85.075,106.435 85.862,107.222 86.397,107.222 87.049,107.874 C14.2
NetC15_1: C15.1 U3.21 | length 2.9
  Bottom Layer w0.2: U3.21 84.375,107.675 C15.1
NetC16_2: C16.2 SW1.1 SW1.3 U1.7 | length 33
  Top Layer w0.2: v1(32.3,108.1) 32.368,108.1 32.668,107.8 34.5,107.8 36,109.3 45.6,109.3 47,107.9 v1(48.7,107.9)
  Bottom Layer w0.2: C16.2 28.25,111.494 SW1.1 ; SW1.3 28.25,105.474 28.046,105.678 28.046,106.912 28.25,107.116 SW1.1 ; v1(32.3,108.1) 31.425,108.975 SW1.1 ; v1(48.7,107.9) 49.85,106.75 U1.7
NetD2_2: D2.2 R8.2 | length 14
  Top Layer w0.2: R8.2 87.1,93.5 88.1,94.5 88.1,100.276 90.794,102.97 D2.2
NetD3_2: D3.2 R9.2 | length 16.6
  Top Layer w0.2: R9.2 87,95.4 87.8,96.2 87.8,100.4 91.773,104.373 91.773,107.973 91.9,108.1 92.73,108.1 D3.2
NetD4_2: D4.2 R10.2 | length 20
  Top Layer w0.2: R10.2 87.2,97.3 87.5,97.6 87.5,100.524 91.473,104.497 91.473,112.973 91.817,113.317 92.747,113.317 D4.2
NetD5_2: D5.2 R11.2 | length 23.1
  Top Layer w0.2: R11.2 86.9,99.2 87.2,99.5 87.2,100.649 91.173,104.622 91.173,117.673 91.917,118.417 92.747,118.417 D5.2
NetF1_1: F1.1 J1.1
NetJ4_1: J4.1 U2.14 U2.15
NetJ4_2: J4.2 U2.18 U2.19
NetJ5_1: J5.1 U3.14 U3.15
NetJ5_2: J5.2 U3.18 U3.19
NetJ6_2: J6.2 U4.6 | length 4.6
  Top Layer w0.2: v1(32,119.2) 32.068,119.2 32.318,119.45 J6.2
  Bottom Layer w0.2: U4.6 31.67,120.909 31.67,119.53 v1(32,119.2)
NetJ6_3: J6.3 U4.7 | length 5.5
  Top Layer w0.2: v1(32.6,118.4) 32.648,118.352 32.648,117.902 33.6,116.95 J6.3
  Bottom Layer w0.2: v1(32.6,118.4) 32.6,118.468 32.935,118.803 U4.7
NetR3_1: R3.1 R4.2 U1.26 | length 40.8
  Top Layer w0.2: v1(58.309,111.709) 58.309,111.291 61.358,108.242 66.058,108.242 67,107.3 67,102.8 v1(67.4,102.4) ; R3.1 v1(77.5,103.4)
  Bottom Layer w0.2: U1.26 57.75,112.269 v1(58.309,111.709) ; v1(67.4,102.4) 67.4,101.524 67.7,101.224 67.7,99.024 66.971,98.295 66.971,96.705 67.676,96 74.2,96 75.6,96 76.5,96.9 76.5,102.33 76.793,102.623 76.971,102.623 77.4,103.052 R4.2
NetR6_2: R6.2 U1.60 | length 3.1
  Bottom Layer w0.2: U1.60 55.25,100.538 55.6,100.188 R6.2
nFAULT0: R1.1 U1.36 U2.2 | length 10.6
  Top Layer w0.2: v1(66.7,116.2) 66.713,116.187 68.438,116.187 U2.2
  Bottom Layer w0.2: U1.36 63.901,109.75 65.4,111.249 R1.1 65.575,113.6 66.7,114.725 v1(66.7,116.2)
nFAULT1: R5.1 U1.51 U3.2 | length 36.3
  Bottom Layer w0.2: U1.51 59.7,101.7 59.7,100.998 59.373,100.671 59.373,100.191 59.887,99.678 59.887,97.113 63.7,93.3 79.026,93.3 83.526,97.8 R5.1 85.6,99.225 85.675,99.3 U3.2
POWER: R8.1 U1.59 | length 38
  Top Layer w0.2: v1(57,93) 58.549,93 60.019,94.47 64.214,94.47 65.985,92.7 82.3,92.7 83.1,93.5 R8.1
  Bottom Layer w0.2: U1.59 55.75,100.462 56.583,99.629 56.583,98.144 57,97.727 v1(57,93)
PWM0.1: U1.37 U2.7 | length 7.6
  Top Layer w0.2: v1(66.8,112.8) 66.868,112.8 66.993,112.925 U2.7
  Bottom Layer w0.2: U1.37 63.826,109.25 66.4,111.824 66.4,112.4 v1(66.8,112.8)
PWM0.2: U1.38 U2.8 | length 7.2
  Top Layer w0.2: v1(67,112) 67.068,112 67.343,112.275 U2.8
  Bottom Layer w0.2: U1.38 63.75,108.75 v1(67,112)
PWM1.1: U1.41 U3.7 | length 36.1
  Bottom Layer w0.2: U1.41 61.307,107.25 60.392,106.335 60.392,104.508 62.2,102.7 63.876,102.7 64.6,101.976 64.6,97.327 67.127,94.8 78.376,94.8 82.425,98.849 U3.7
PWM1.2: U1.42 U3.8 | length 34.4
  Bottom Layer w0.2: U1.42 61.231,106.75 60.692,106.211 60.692,104.634 62.326,103 64,103 64.9,102.1 64.9,97.451 67.251,95.1 78.251,95.1 81.775,98.624 U3.8
SCK: J2.5 J3.5 U1.21 U2.5 U3.5 | length 79.2
  Top Layer w0.2: v1(58.9,104.179) 58.9,102.7 60.5,101.1 61.3,101.1 62,100.4 62,99 62.275,98.725 62.342,98.792 62.665,98.792 v1(62.713,98.84) ; v1(61.246,120.921) 60.859,121.308 55.408,121.308 53.75,119.65 J3.5 53.75,117.65 54.736,116.664 54.839,116.664 v1(54.887,116.616) 57.733,113.769 66.331,113.769 66.786,114.225 U2.5
  Bottom Layer w0.2: v1(54.887,116.616) 55.25,116.252 U1.21 55.225,113.225 55.225,111.175 59.1,107.3 59.1,104.447 58.9,104.247 v1(58.9,104.179) ; v1(61.246,120.921) 61.246,118.654 J2.5 ; v1(62.713,98.84) 62.713,98.174 62.9,97.987 62.9,97.389 62.577,97.066 62.577,95.823 64.2,94.2 78.653,94.2 83.303,98.85 83.608,98.85 83.725,98.967 U3.5
SWCLK: P2.3 U1.49 | length 2.1
  Bottom Layer w0.2: U1.49 60.8,101.7 60.8,99.95 P2.3
SWDIO: P2.2 U1.46 | length 8.8
  Top Layer w0.2: P2.2 63.54,101.34 64.5,102.3 65.5,102.3 65.5,104 65.2,104.3 64.193,104.3 v1(63.793,104.7)
  Bottom Layer w0.2: U1.46@62.7,104.7 U1.46 62.775,104.725 63.768,104.725 v1(63.793,104.7)
USART_RX: P1.1 U1.30 | length 20.6
  Bottom Layer w0.2: U1.30 59.721,113.279 59.721,116.572 59.95,116.801 59.95,120.48 60.97,121.5 63.9,121.5 64.9,120.5 64.9,119.5 65.9,118.5 67.349,118.5 69.067,120.219 69.459,120.219 P1.1
USART_TX: P1.2 U1.29 | length 23
  Bottom Layer w0.2: U1.29 59.25,116.526 59.65,116.926 59.65,120.604 60.846,121.8 64.024,121.8 65.2,120.624 65.2,119.624 65.971,118.854 67.278,118.854 68.515,120.09 68.515,121.815 P1.2
VM: C1.2 C2.2 C3.2 C4.2 C7.2 C8.1 C10.1 C15.2 C18.1 C20.1 D1.1 F1.2 U2.13 U2.20 U3.13 U3.20 | length 10.8
  Top Layer w0.381: U2.20 77.977,114.225 77.977,115.077 C7.2
  Bottom Layer w0.381: U3.20 83.725,109.725 83.9,109.9 84.8,109.9 C15.2
  other v3: 73,97 74,97 75,97 73,98 74,98 75,98 73,99 74,99 75,99 73,100 74,100 75,100 73,101 74,101 75,101 73,102 74,102 75,102 74,104.5 75,104.5 75,105.5 76,105.5 85.4,109.6 86.1,109.6 85.4,110.3 86.1,110.3 85.4,111 86.1,111 78.5,115.3 79.2,115.3 78.5,116 79.2,116 78.5,116.7 79.2,116.7
pads on no net: J1.MH1 J1.MH2 J2.MH1 J2.MH2 J3.MH1 J3.MH2 J6.MH1 J6.MH2 SW1. U1.2 U1.3 U1.4 U1.8 U1.9 U1.10 U1.11 U1.14 U1.15 U1.16 U1.20 U1.24 U1.28 U1.35 U1.39 U1.40 U1.43 U1.52 U1.53 U1.54 U1.55 U1.61 U1.62 U4.5
copper on no net:
  other v4: 40.5,96 91.5,96 40.5,123 91.5,123

## Polygon pours and split planes (outlines as drawn)
GND on Top Layer "GND_L01_P009" (solid, pour order 9): 25.5,127 95.5,127 95.5,92 25.5,92
GND on Top Layer "GND_L01_P011" (solid, pour order 11): 73.3,112.5 73.3,111.4 77.8,111.4 77.8,112.5
VM on Top Layer "VM_L01_P005" (solid, pour order 5): 84.9,111.1 85.1,111.3 86.3,111.3 86.5,111.1 86.5,104.9 86.3,104.7 76.6,104.7 75.6,103.7 75.6,96.4 73.6,96.4 71.9,94.7 65.6,94.7 64.1,96.2 58.5,96.2 55.9,93.6 50.6,93.6 50.6,97.4 54.8,97.4 55.3,97.9 65.8,97.9 67.5,96.2 70.9,96.2 71.25,96.55 71.25,98.35 72.4,99.5 72.4,108.1 73.3,109 73.3,109.7 75.4,109.7 76.5,108.6 76.5,106.4 76.7,106.2 84.1,106.2 84.9,107 84.9,109.05
NetJ4_2 on Top Layer "NETJ4_2_L01_P000" (solid, pour order 0): 80.9,114.15 80.5,113.75 73.3,113.75 73.3,112.75 81.25,112.75 82.1,113.6 82.1,120.9 80.9,120.9
NetF1_1 on Top Layer "NETF1_1_L01_P004" (solid, pour order 4): 42.4,99.8 44.2,98 44.2,93.6 48.4,93.6 48.4,98.8 46.2,101 37.2,101 36.5,100.3 33,100.3 33,99.1 37.1,99.1 37.8,99.8
VM on Top Layer "VM_L01_P006" (solid, pour order 6): 79.5,114.3 80,114.8 80,117.9 78.6,117.9 77.6,116.9 77.6,114.4 77.7,114.3
NetJ4_1 on Top Layer "NETJ4_1_L01_P001" (solid, pour order 1): 83.4,112.1 82.4,111.1 73.3,111.1 73.3,110.2 83.1,110.2 84.6,111.7 84.6,120.9 83.4,120.9 83.4,119.6
GND on Bottom Layer "GND_L02_P010" (solid, pour order 10): 25.5,127 95.5,127 95.5,92 25.5,92
VM on Bottom Layer "VM_L02_P007" (solid, pour order 7): 79.7,117.1 79.5,117.3 78.1,117.3 77.9,117.1 77.9,106.8 75.4,106.8 74.5,105.9 72.4,105.9 72.4,96.6 75.6,96.6 75.6,103.7 76.7,104.8 79.2,104.8 79.2,112.6 79.7,113.1 79.7,114.7
VM on Bottom Layer "VM_L02_P008" (solid, pour order 8): 84.2,109.3 86.7,109.3 87.7,110.3 87.7,111.5 84.9,111.5 84.2,110.8
NetJ5_2 on Bottom Layer "NETJ5_2_L02_P002" (solid, pour order 2): 84.6,112.5 83.2,111.1 83.2,104.8 82.3,104.8 82.3,111.7 83.4,112.8 83.4,120.9 84.6,120.9
NetJ5_1 on Bottom Layer "NETJ5_1_L02_P003" (solid, pour order 3): 80.6,104.8 80.6,111.5 82.1,113 82.1,120.9 80.9,120.9 80.9,113.5 79.7,112.3 79.7,104.8

## Silkscreen, mask and mechanical layers (free items; w line width, h text height)
Top Overlay:
  text "ENC 0" at 43.936,126.562 h3 r270
  text "M0" at 72.936,126.031 h3 r270
  text "ENC1" at 89.57,115.142 h2.5 r90
  text "ROBOSZPON" at 45.928,112.73 h2.54
  text "ENC0" at 89.57,109.917 h2.5 r90
  text "CAN" at 89.57,105.196 h2.5 r90
  text "POWER" at 89.57,98.303 h2.5 r90
Bottom Overlay:
  drawing of 33 lines, arcs and shapes, not listed
  text "M1" at 72.936,121.769 h3 r270
  text "ENC 1" at 43.935,118.588 h3 r270
  text "CAN" at 25.911,115.869 h3 r270
  text "GND" at 77.193,115.865 h1.27
  text "Tx" at 76.558,113.865 h1.27
  text "Rx" at 76.558,111.865 h1.27
  text "POWER" at 25.911,94.238 h3 r270
  text "GND" at 57.849,93.866 h1.14 r270
  text "3.3V" at 65.469,93.39 h1.14 r270
  text "SWDIO" at 62.929,92.818 h1.14 r270
  text "SWCLK" at 60.389,92.723 h1.14 r270
Bottom Solder:
  drawing of 17 lines, arcs and shapes, not listed
Mechanical 1:
  the board outline again, w0.2
Mechanical 14:
  the board outline again, w0.2